# Altium PCB Prototype_REV1.PcbDoc
Units mm, origin at the board's own origin, x right, y up, seen from the top; angles counter-clockwise.
Board outline 100 x 47.5 mm, 2 copper layers (Top Layer, Bottom Layer); 146 components, 83 nets, 580 pads, 382 vias.
Unrouted connection lines stored in the file: 136.
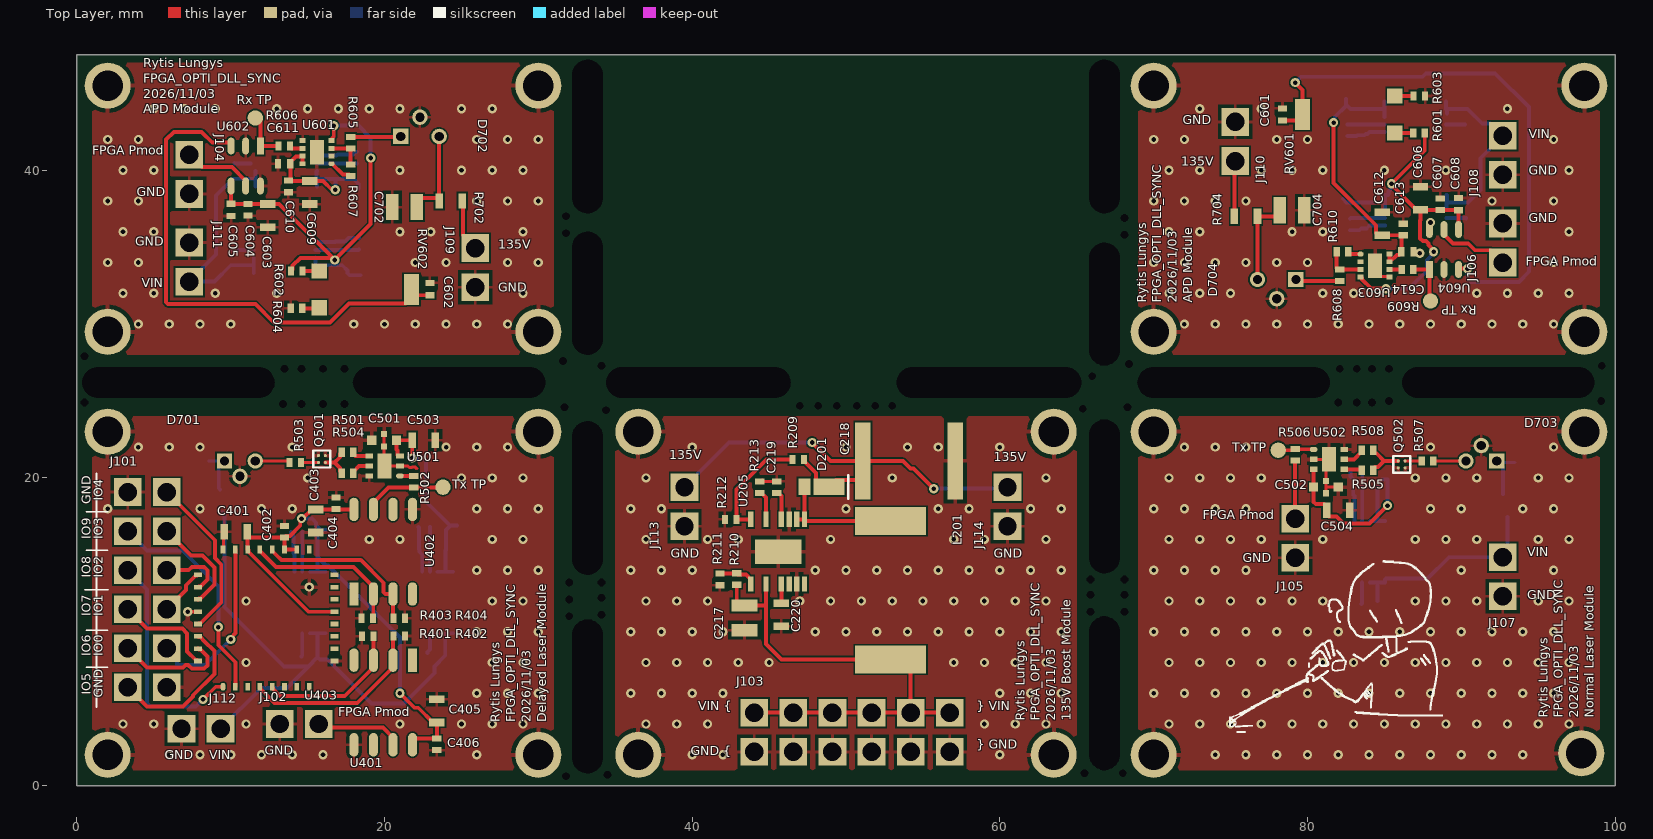
[diagram p0: Top Layer view]
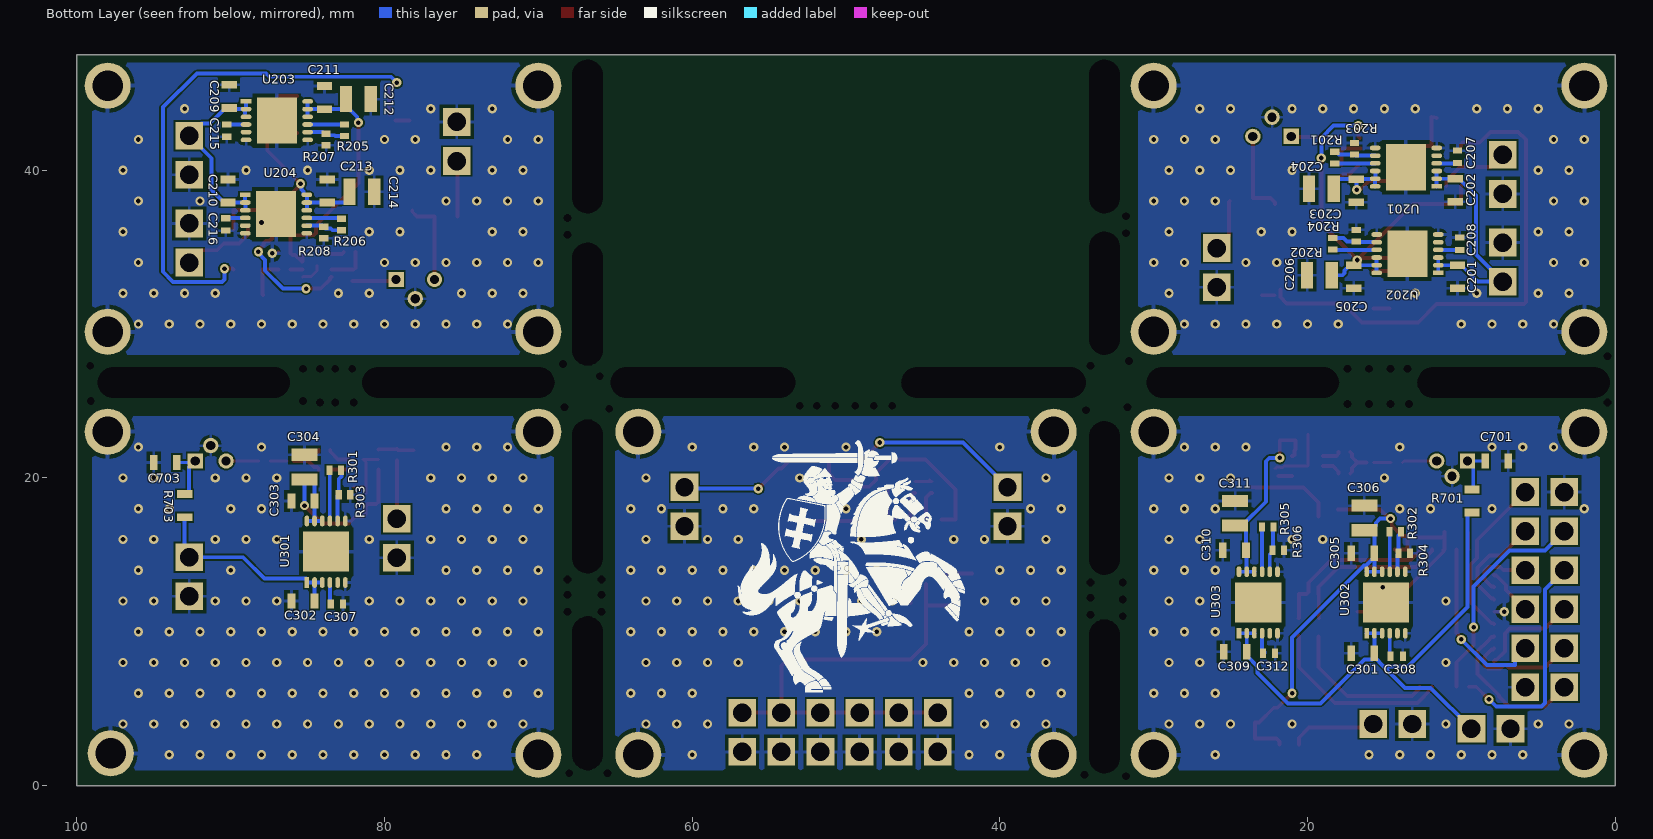
[diagram p1: Bottom Layer view, seen from below]

## Layer stack, top to bottom
Top Solder: solder mask 0.0102, Solder Resist, Dk 3.5
Top Layer: signal copper 0.0356
Dielectric 1: dielectric 0.32, FR-4, Dk 4.8
Bottom Layer: signal copper 0.0356
Bottom Solder: solder mask 0.0102, Solder Resist, Dk 3.5

## Board outline
0,0 100,0 100,47.5 0,47.5

## Design rules (kind name [scope] priority, off if disabled: settings)
BoardOutlineClearance [All] p1: gap=0.2 ignorepadtopadclearanceinfootprint=FALSE
Clearance Clearance_1 [All] p1: gap=0.1 ignorepadtopadclearanceinfootprint=FALSE
Clearance [All] p2: gap=0.203 ignorepadtopadclearanceinfootprint=FALSE except(0.25: Arc-Hole Track-Hole SMDPad-Hole THPad-Hole Via-Hole Fill-Hole Poly-Hole Region-Hole Text-Hole)
ComponentClearance [All] p1: gap=0.127 collisioncheckmode=3 verticalgap=0.127 showdistances=TRUE
DiffPairsRouting [All] p1: maxlimit=0.381 minlimit=0.203 mostfreqgap=0.203 toplayer_minwidth=0.203 toplayer_maxwidth=25.4 toplayer_prefwidth=0.203 bottomlayer_minwidth=0.203 bottomlayer_maxwidth=25.4 bottomlayer_prefwidth=0.203 maxuncoupledlength=12.7
Height [All] p1: minheight=0 maxheight=1816.048 prefheight=12.7
HoleSize [All] p1: absolutevalues=TRUE maxlimit=6.3 minlimit=0.3 maxpercent=80.000 minpercent=20.000
HoleToHoleClearance [All] p1: gap=0.25 allowstackedmicrovias=FALSE
MinimumAnnularRing [All] p1: minimumring=0.076
MinimumSolderMaskSliver [All] p1: minsoldermaskwidth=0
PlaneClearance [All] p1: clearance=0.203
PlaneConnect PlaneConnectPowerPads [InPadClass('PowerPads')] p1: planeconnectstyle=Direct reliefexpansion=0.508 reliefentries=4 reliefconductorwidth=0.254 reliefairgap=0.254
PlaneConnect [All] p2: pad.planeconnectstyle=Relief pad.reliefexpansion=0.3 pad.reliefentries=4 pad.reliefconductorwidth=0.203 pad.reliefairgap=0.203 via.planeconnectstyle=Direct via.reliefexpansion=0.3 via.reliefentries=4 via.reliefconductorwidth=0.127 via.reliefairgap=0.127
PolygonConnect PolygonConnectPowerPads [All vs (InPadClass('PowerPads'))] p1: connectstyle=Direct reliefconductorwidth=0.254 reliefentries=4 polygonreliefangle="90 Angle" airgapwidth=0.254
PolygonConnect [All] p2: thpad.connectstyle=Relief thpad.reliefconductorwidth=0.203 thpad.reliefentries=4 thpad.polygonreliefangle="90 Angle" thpad.airgapwidth=0.203 smdpad.connectstyle=Relief smdpad.reliefconductorwidth=0.203 smdpad.reliefentries=4 smdpad.polygonreliefangle="90 Angle" smdpad.airgapwidth=0.203 via.connectstyle=Direct via.reliefconductorwidth=0.127 via.reliefentries=4 via.polygonreliefangle="90 Angle" via.airgapwidth=0.127
RoutingVias [All] p1: holewidth=0.3 width=0.6 viastyle="Through Hole" minholewidth=0.3 minwidth=0.6 maxholewidth=0.6 maxwidth=6.6
SilkToSilkClearance [All] p1: silktosilkclearance=0
SilkToSolderMaskClearance [IsPad] p1: minsilkscreentomaskgap=0.127 clearancetoexposedcopper=TRUE
SolderMaskExpansion [All] p1: expansion=0.075 istentingtop=FALSE
SupplyNets "Schematic Supply Nets_6" [InNet('135V')] p1: voltage=0.000
SupplyNets "Schematic Supply Nets_5" [InNet('3V3')] p2: voltage=0.000
SupplyNets "Schematic Supply Nets_4" [InNet('Vvar')] p3: voltage=0.000
SupplyNets "Schematic Supply Nets_3" [InNet('5VGaN')] p4: voltage=0.000
SupplyNets "Schematic Supply Nets_2" [InNet('Vin')] p5: voltage=0.000
SupplyNets "Schematic Supply Nets_1" [InNet('5V')] p6: voltage=0.000
SupplyNets "Schematic Supply Nets" [InNet('GND')] p7: voltage=0.000
Width [All] p1: maxlimit=25.4 minlimit=0.203 preferedwidth=0.203 minimp=50.000000 maximp=50.000000 favimp=50.000000
20 further rules are at their usual default settings.

## Classes and differential pairs
component class Tx_PSU: C301 C302 C303 C304 C305 C306 C307 C308 C309 C310 C311 C312 R301 R302 R303 R304 R305 R306 U301 U302 U303
component class Time_Delay: C401 C402 C403 C404 C405 C406 R401 R404 R502 R504 U401 U403 U502
component class Rx_PSU: C201 C202 C203 C204 C205 C206 C207 C208 C209 C210 C211 C212 C213 C214 C215 C216 C217 C218 C219 C220 D201 L201 R201 R202 R203 R204 R205 R206 R207 R208 R209 R210 R211 R212 R213 U201 U202 U203 U204 U205
component class Light_Detection: C601 C602 C603 C604 C605 C606 C607 C608 C609 C610 C611 C612 C613 C614 R601 R602 R603 R604 R605 R606 R607 R608 R609 R610 RV601 RV602 U601 U602 U603 U604
component class Laser_System: C701 C702 C703 C704 D701 D702 D703 D704 R701 R702 R703 R704
component class Laser_Driver: C401 C402 C403 C404 Q501 Q502 R401 R502 R504 R505 R506 R507 R508 U401 U502
component class Inputs_Outputs: J101 J102 J103 J106 J108 J110 J111

## Components (designator, comment, footprint, x,y, rotation, side; value= is the part's Value field where it differs from the comment)
C201 "1uF" "1UF 0603" 10.25,33.075 r90 bottom
C202 "1uF" "1UF 0603" 10.4,38.7 r90 bottom
C203 "1uF" "1UF 0603" 16.825,38.675 r90 bottom
C204 "10uF" "10UF 0805" 19.1,38.8 r180 bottom
C205 "1uF" "1UF 0603" 17,33.075 r90 bottom
C206 "10uF" "10UF 0805" 19.225,33.175 r180 bottom
C207 "10nF" "10NF 0402" 10.25,40.875 r270 bottom
C208 "10nF" "10NF 0402" 10.1,35.225 r270 bottom
C209 "1uF" "1UF 0603" 90.1,44.8 r270 bottom
C210 "1uF" "1UF 0603" 90.175,38.65 r270 bottom
C211 "1uF" "1UF 0603" 83.9,44.725 r270 bottom
C212 "10uF" "10UF 0805" 81.7,44.625 r0 bottom
C213 "1uF" "1UF 0603" 83.725,38.65 r270 bottom
C214 "10uF" "10UF 0805" 81.475,38.6 r0 bottom
C215 "10nF" "10NF 0402" 90.25,42.575 r90 bottom
C216 "10nF" "10NF 0402" 90.325,36.475 r90 bottom
C217 "10uF" "10UF 0805" 43.4,10.9 r90 top
C218 "1uF" "1UF 2220" 57.1,21.1 r90 top
C219 "100nF" "100NF 0402" 45.5,19.4 r270 top
C220 "1uF" "1UF 0603" 45.8,11.1 r90 top
C301 "1uF" "1UF 0603" 16.4,8.6 r180 bottom
C302 "1uF" "1UF 0603" 85.3,12 r180 bottom
C303 "1uF" "1UF 0603" 85.3,18.5 r180 bottom
C304 "10uF" "10UF 0805" 85.2,20.7 r270 bottom
C305 "1uF" "1UF 0603" 16.4,15.1 r180 bottom
C306 "10uF" "10UF 0805" 16.3,17.4 r270 bottom
C307 "10nF" "10NF 0402" 83.1,11.8 r0 bottom
C308 "10nF" "10NF 0402" 14.2,8.4 r0 bottom
C309 "1uF" "1UF 0603" 24.7,8.7 r180 bottom
C310 "1uF" "1UF 0603" 24.75,15.3 r180 bottom
C311 "10uF" "10UF 0805" 24.7,17.7 r270 bottom
C312 "10nF" "10NF 0402" 22.5,8.6 r0 bottom
C401 "1uF" "1UF 0603" 10.325,16.5 r0 top
C402 "100nF" "100NF 0402" 13.5,16.5 r270 top
C403 "1uF" "1UF 0603" 15.525,17.2 r90 top
C404 "100nF" "100NF 0402" 16.85,18.35 r270 top
C405 "1uF" "1UF 0603" 23.4,4.85 r270 top
C406 "100nF" "100NF 0402" 23.4,2.675 r90 top
C501 "100n FT" "100N FT 0603" 19.175,22.45 r0 top
C502 "100n FT" "100N FT 0603" 82,19.4 r180 top
C503 "1uF" "1UF 0603" 22.55,22.45 r180 top
C504 "1uF" "1UF 0603" 82,17.9 r180 top
C601 "10nF" "10NF 0402" 78.375,43.625 r270 top
C602 "10nF" "10NF 0402" 22.95,32.275 r270 top
C603 "1uF" "1UF 0603" 12.4,37.05 r90 top
C604 "100nF" "100NF 0402" 11.125,37.425 r90 top
C605 "10nF" "10NF 0402" 10.025,37.425 r90 top
C606 "1uF" "1UF 0603" 87.35,38.175 r270 top
C607 "100nF" "100NF 0402" 88.625,37.8 r270 top
C608 "10nF" "10NF 0402" 89.825,37.8 r270 top
C609 "1uF" "1UF 0603" 15.15,38.55 r90 top
C610 "100nF" "100NF 0402" 13.75,38.95 r90 top
C611 "10nF" "10NF 0402" 13.475,40.425 r0 top
C612 "1uF" "1UF 0603" 84.85,36.525 r270 top
C613 "100nF" "100NF 0402" 86.225,36.15 r270 top
C614 "10nF" "10NF 0402" 86.5,34.7 r180 top
C701 "68pF" "2.2NF 0603" 7.7,21.1 r0 bottom
C702 "1nF" "10UF 0805" 21.3,37.6 r0 top
C703 "68pF" "2.2NF 0603" 94.252,20.998 r180 bottom
C704 "1nF" "10UF 0805" 79,37.4 r180 top
D201 "SDiode" SDIODE 48.4,19.4 r0 top
D701 "PLT5 450GB" "PLT5 450GB" 9.598,21.102 r0 top
D702 "MTAPD-06-007" MTAPD-06-007 22.3,42.2 r180 top
D703 "PLT5 450GB" "PLT5 450GB" 92.3,21.1 r180 top
D704 "MTAPD-06-007" MTAPD-06-007 78,32.9 r0 top
J101 "Spikelinis conectorius" "12PIN HEADER STRIP"#1 5.84,20.33 r180 top
J102 "Spikelinis conectorius" "2PIN HEADER STRIP" 15.725,4 r270 top
J103 "Spikelinis conectorius" "12PIN HEADER STRIP"#2 42.79,4.74 r270 top
J104 "Spikelinis conectorius" "2PIN HEADER STRIP" 7.3,41 r0 top
J105 "Spikelinis conectorius" "2PIN HEADER STRIP" 79.2,17.34 r0 top
J106 "Spikelinis conectorius" "2PIN HEADER STRIP" 92.7,34 r180 top
J107 "Spikelinis conectorius" "2PIN HEADER STRIP" 92.7,14.84 r0 top
J108 "Spikelinis conectorius" "2PIN HEADER STRIP" 92.7,42.24 r0 top
J109 "Spikelinis conectorius" "2PIN HEADER STRIP" 25.9,34.94 r0 top
J110 "Spikelinis conectorius" "2PIN HEADER STRIP" 75.3,40.6 r180 top
J111 "Spikelinis conectorius" "2PIN HEADER STRIP" 7.3,32.76 r180 top
J112 "Spikelinis conectorius" "2PIN HEADER STRIP" 9.34,3.7 r270 top
J113 "Spikelinis conectorius" "2PIN HEADER STRIP" 39.5,19.4 r0 top
J114 "Spikelinis conectorius" "2PIN HEADER STRIP" 60.5,19.4 r0 top
L201 "100uH" 100UH 52.9,8.2 r0 top
Q501 "EPC2036" EPC2036 16.15,21 r180 top
Q502 "EPC2036" EPC2036 85.9,21.1 r0 top
R201 "47K5" "47.5K 0402" 18.225,40.825 r270 bottom
R202 "23K2" "23.2K 0402" 18.35,35.225 r90 bottom
R203 "15k" "15K 0402" 16.95,41.4 r270 bottom
R204 "13K3" "13K3 0402" 16.825,35.75 r270 bottom
R205 "47K5" "47.5K 0402" 82.6,42.6 r90 bottom
R206 "23K2" "23.2K 0402" 82.8,36.475 r270 bottom
R207 "15k" "15K 0402" 83.8,42 r90 bottom
R208 "13K3" "13K3 0402" 83.95,35.95 r90 bottom
R209 "1M" "1M 0402" 46.9,21.2 r0 top
R210 "1M" "1M 0402" 42.9,13.425 r270 top
R211 "287k" "1M 0402" 41.8,13.4 r90 top
R212 "12k1" "1M 0402" 42.5,17.3 r0 top
R213 "154k" "1M 0402" 44.4,19.4 r270 top
R301 "47K5" "47.5K 0402" 83.2,20.5 r0 bottom
R302 "23K2" "23.2K 0402" 14.3,16.5 r180 bottom
R303 "15k" "15K 0402" 82.6,18.9 r0 bottom
R304 "13K3" "13K3 0402" 13.7,15.1 r0 bottom
R305 "47K5" "47.5K 0402" 22.575,16.8 r0 bottom
R306 "15k" "15K 0402" 21.9,15.3 r0 bottom
R401 "200R" "200R 0402" 18.9,9.7 r0 top
R402 "200R" "200R 0402" 20.95,9.725 r180 top
R403 "200R" "200R 0402" 18.875,10.875 r0 top
R404 "200R" "200R 0402" 20.95,10.875 r180 top
R501 "2R2" "2R2 0402" 17.6,21.675 r180 top
R502 "22R" "22R 0402" 21.9,19.75 r270 top
R503 "47R" "1R 0402" 14.2,21 r180 top
R504 "1R" "1R 0402" 17.6,20.3 r180 top
R505 "2R2" "2R2 0402" 83.9,20.5 r0 top
R506 "22R" "22R 0402" 79.2,21.5 r270 top
R507 "47R" "1R 0402" 87.8,21.1 r0 top
R508 "1R" "1R 0402" 83.9,21.8 r0 top
R601 "100R" "100R 0402" 87.25,42.425 r180 top
R602 "100R" "100R 0402" 14.3,33.45 r0 top
R603 "3K3" "3K3 0402" 87.275,44.825 r0 top
R604 "3K3" "3K3 0402" 14.275,31.025 r180 top
R605 "10R" "10R 0402" 17.8,41.8 r270 top
R606 "100R" "100R 0402" 13.475,41.575 r180 top
R607 "200R" "200R 0402" 17.8,40 r90 top
R608 "10R" "10R 0402" 82.103,33.171 r90 top
R609 "100R" "100R 0402" 86.5,33.55 r0 top
R610 "200R" "200R 0402" 82.275,34.7 r180 top
R701 "1K" "1K 0603" 9.3,18.5 r270 bottom
R702 "100k" "1K 0603" 24.3,38 r0 top
R703 "1K" "1K 0603" 93,18.2 r270 bottom
R704 "100k" "1K 0603" 76,37 r180 top
RV601 "5K TRIM" "5K TRIM" 82.675,43.625 r90 top
RV602 "5K TRIM" "5K TRIM" 18.75,32.25 r270 top
U201 "LP38798SD-ADJ/NOPB" LP38798SD-ADJ/NOPB 11.6,38.95 r0 bottom
U202 "LP38798SD-ADJ/NOPB" LP38798SD-ADJ/NOPB 11.5,33.325 r0 bottom
U203 "LP38798SD-ADJ/NOPB" LP38798SD-ADJ/NOPB 89,44.475 r180 bottom
U204 "LP38798SD-ADJ/NOPB" LP38798SD-ADJ/NOPB 89.05,38.4 r180 bottom
U205 "LT8331EMSE#PBF" LT8331EMSE#PBF 43.8,13.1 r90 top
U301 "LP38798SD-ADJ/NOPB" LP38798SD-ADJ/NOPB 85.05,13.2 r90 bottom
U302 "LP38798SD-ADJ/NOPB" LP38798SD-ADJ/NOPB 16.15,9.9 r90 bottom
U303 "LP38798SD-ADJ/NOPB" LP38798SD-ADJ/NOPB 24.45,9.9 r90 bottom
U401 "MC100EPT20DR2G" MC100EPT20DR2G 21.82,8.15 r270 top
U402 "MC100EPT21DR2G" MC100EPT21DR2G 18.01,12.45 r90 top
U403 "MC100EP195FAG" MC100EP195FAG 9.5,6.425 r90 top
U501 "LMG1025QDEERQ1" LMG1025QDEERQ1 21,20.125 r180 top
U502 "LMG1025QDEERQ1" LMG1025QDEERQ1 80.4,21.85 r0 top
U601 "OPA855IDSGT" OPA855IDSGT 16.55,40.425 r180 top
U602 "TLV3501AIDBVT" TLV3501AIDBVT 11.925,41.575 r270 top
U603 "OPA855IDSGT" OPA855IDSGT 83.45,34.55 r0 top
U604 "TLV3501AIDBVT" TLV3501AIDBVT 87.925,33.55 r90 top

## Footprints (in the part's own frame and the unit in brackets; to place one, negate y for a bottom-side part, rotate by r counter-clockwise, add the part's x,y. Pads: shape width x height; smd on the part's side, far side on the other; paste and mask are expansions set on the pad)
"1K 0603" [mm] "ERA-3AEB102V"
  rect 0.5x1 smd: 1(-0.75,0) 2(0.75,0)
  body extent -0.8,-0.4 0.8,0.4, height 0.46
"1M 0402" [mm] "RC0402FR-7D1ML"
  rect 0.4x0.6 smd: 1(-0.375,0) 2(0.375,0)
  body extent -0.5,-0.25 0.5,0.25, height 0.41
"1R 0402" [mm] "CRT0402-FZ-1R00GLF"
  rect 0.4x0.6 smd: 1(-0.371,0.003) 2(0.379,0.003)
  body extent -0.5,-0.25 0.5,0.25, height 0.36
"1UF 0603" [mm] "CGA3E1X7R1E105K080AC"
  rect 0.5x1 smd: 1(-0.75,0) 2(0.75,0)
  body extent -0.8,-0.4 0.8,0.4, height 0.81
"1UF 2220" [mm] "KTS251B105M55N0T00"
  rect 5x1 smd: 1(0,0) 2(0,6)
  body extent -2.5,0.15 2.5,5.85, height 2
"2.2NF 0603" [mm]
  rect 0.5x1 smd: 1(-0.75,0) 2(0.75,0)
  body extent -0.87,-0.48 0.87,0.48, height 0.88
"2PIN HEADER STRIP" [mm]
  rect 1.8x1.8 hole 1.2: 1(0,0) 2(0,-2.54)
  body extent -1.24,-3.94 1.3,1.26, height 9.28
"2R2 0402" [mm] "CRT0402-FZ-2R00GLF"
  rect 0.4x0.6 smd: 1(-0.371,0.003) 2(0.379,0.003)
  body extent -0.5,-0.25 0.5,0.25, height 0.36
"3K3 0402" [mm] "ERJ-U02F3301X"
  rect 0.4x0.6 smd: 1(-0.375,0) 2(0.375,0)
  body extent -0.5,-0.25 0.5,0.25, height 0.36
"5K TRIM" [mm] "3314G-1-502E"
  rect 1x1 smd: 1(-1.2,-3) 3(1.2,-3)
  rect 2x1 smd: 2(0,3)
  body extent -2.5,-3.1 2.5,3.1, height 2.74
"10NF 0402" [mm] "C0402C103J5RACTU"
  rect 0.4x0.6 smd: 1(-0.4,0) 2(0.4,0)
  body extent -0.53,-0.27 0.53,0.28, height 0.56
"10R 0402" [mm] "CRT0402-DZ-10R0GLF"
  rect 0.4x0.6 smd: 1(-0.371,0.003) 2(0.379,0.003)
  body extent -0.5,-0.25 0.5,0.25, height 0.36
"10UF 0805" [mm] "GRJ21BR61E106KE01K"
  rect 0.8x1.7 smd: 1(-0.8,0) 2(0.8,0)
  body extent -1,-0.72 1,0.72, height 1.26
"12PIN HEADER STRIP"#1 [mm] "TSW-112-07-G-S"
  rect 1.8x1.8 hole 1.2: 1(0,13.95) 2(0,11.41) 3(0,8.87) 4(0,6.33) 5(0,3.79) 7(2.54,13.95) 8(2.54,11.41) 9(2.54,8.87) 10(2.54,6.33) 11(2.54,3.79) 12(2.54,1.25) 23(0,1.25)
  body extent -1.16,0.05 3.66,15.29, height 8.39
"12PIN HEADER STRIP"#2 [mm] "TSW-112-07-G-S"
  rect 1.8x1.8 hole 1.2: 1(0,13.95) 2(0,11.41) 3(0,8.87) 4(0,6.33) 5(0,3.79) 6(0,1.25) 7(2.54,13.95) 8(2.54,11.41) 9(2.54,8.87) 10(2.54,6.33) 11(2.54,3.79) 12(2.54,1.25)
  body extent -1.16,0.05 3.66,15.29, height 8.39
"13K3 0402" [mm] "CRCW040213K3FKED"
  rect 0.4x0.6 smd: 1(-0.375,0) 2(0.375,0)
  body extent -0.5,-0.25 0.5,0.25, height 0.36
"15K 0402" [mm] "CRCW040215K0FKED"
  rect 0.4x0.6 smd: 1(-0.375,0) 2(0.375,0)
  body extent -0.5,-0.25 0.5,0.25, height 0.36
"22R 0402" [mm] "ERA-2AKD220X"
  rect 0.4x0.6 smd: 1(-0.375,0) 2(0.375,0)
  body extent -0.5,-0.25 0.5,0.25, height 0.36
"23.2K 0402" [mm] "CR0402-FX-2322GLF"
  rect 0.4x0.6 smd: 1(-0.375,0) 2(0.375,0)
  body extent -0.5,-0.25 0.5,0.25, height 0.36
"47.5K 0402" [mm] "CR0402-FX-4752GLF"
  rect 0.4x0.6 smd: 1(-0.375,0) 2(0.375,0)
  body extent -0.5,-0.25 0.5,0.25, height 0.36
"100N FT 0603" [mm] "NFM18PC104R1C3D"
  rect 0.6x0.6 smd: 1(0,0) 3(1.6,0)
  rect 0.4x0.4 smd: A2(0.8,-0.4) B2(0.8,0.4)
  body extent 0.02,-0.4 1.63,0.4, height 0.61
"100NF 0402" [mm] "C1005X7R1E104K050BB"
  rect 0.4x0.6 smd: 1(-0.375,0) 2(0.375,0)
  body extent -0.48,-0.25 0.53,0.25, height 0.51
"100R 0402" [mm] "ERA-2VEB1000X"
  rect 0.4x0.6 smd: 1(-0.375,0) 2(0.375,0)
  body extent -0.5,-0.25 0.5,0.25, height 0.37
100UH [mm] "744066101"
  rect 4.6x1.8 smd: 1(0,0) 2(0,9)
  body extent -5,-0.5 5,9.5, height 3.81
"200R 0402" [mm] "ERA-2AED201X"
  rect 0.4x0.6 smd: 1(-0.375,0) 2(0.375,0)
  body extent -0.5,-0.25 0.5,0.25, height 0.36
EPC2036 [mm]
  round 0.2 smd: 1(0,0) 2(0,-0.45) 3(0.45,0) 4(0.45,-0.45)
  silkscreen extent -0.33,-0.77 0.77,0.33, body extent -0.22,-0.67 0.67,0.22, height 0.93
LMG1025QDEERQ1 [mm]
  oval 0.5x0.35 smd: 1(0,0)
  rect 0.5x0.35 smd: 2(0,-0.65) 3(0,-1.3) 4(2,-1.3) 5(2,-0.65) 6(2,0)
  rect 0.9x1.6 smd: 7(1,-0.65)
  body extent 0,-1.65 2,0.35, height 0.79
LP38798SD-ADJ/NOPB [mm]
  rect 0.7x0.3 smd: 1(0,0)
  oval 0.7x0.3 smd: 2(0,-0.5) 3(0,-1) 4(0,-1.5) 5(0,-2) 6(0,-2.5) 7(4,-2.5) 8(4,-2) 9(4,-1.5) 10(4,-1) 11(4,-0.5) 12(4,0)
  rect 2.6x3 smd: 13(2,-1.25)
  body extent 0,-3.25 4,0.75, height 0.99
LT8331EMSE#PBF [mm]
  rect 1x0.35 smd: 1(0,0) 2(0,-1) 3(0,-2) 4(0,-2.5) 5(0,-3) 6(0,-3.5) 7(4.2,0) 8(4.2,-1) 9(4.2,-2) 10(4.2,-2.5) 11(4.2,-3) 12(4.2,-3.5)
  rect 1.6x3 smd: 13(2.1,-1.8)
  body extent -0.36,-3.77 4.56,0.27, height 0.89
MC100EP195FAG [mm]
  oval 0.5x0.3 smd: 1(0,0)
  rect 0.5x0.3 smd: 2(0,-0.8) 3(0,-1.6) 4(0,-2.4) 5(0,-3.2) 6(0,-4) 7(0,-4.8) 8(0,-5.6) 17(8.925,-5.6) 18(8.925,-4.8) 19(8.925,-4) 20(8.925,-3.2) 21(8.925,-2.4) 22(8.925,-1.6) 23(8.925,-0.8) 24(8.925,0)
  rect 0.3x0.5 smd: 9(1.675,-7.25) 10(2.475,-7.25) 11(3.275,-7.25) 12(4.075,-7.25) 13(4.875,-7.25) 14(5.675,-7.25) 15(6.475,-7.25) 16(7.275,-7.25) 25(7.275,1.625) 26(6.475,1.625) 27(5.675,1.625) 28(4.875,1.625) 29(4.075,1.625) 30(3.275,1.625) 31(2.475,1.625) 32(1.675,1.625)
  body extent -0.03,-7.3 8.98,1.7, height 1.61
MC100EPT20DR2G [mm]
  rect 1.52x0.6 smd: 1(0,0)
  oval 1.52x0.6 smd: 2(0,-1.27) 3(0,-2.54) 4(0,-3.81) 5(5.5,-3.81) 6(5.5,-2.54) 7(5.5,-1.27) 8(5.5,0)
  body extent -0.22,-4.38 5.77,0.53, height 1.76
MC100EPT21DR2G [mm]
  rect 1.52x0.6 smd: 1(0,0)
  oval 1.52x0.6 smd: 2(0,-1.27) 3(0,-2.54) 4(0,-3.81) 5(5.5,-3.81) 6(5.5,-2.54) 7(5.5,-1.27) 8(5.5,0)
  body extent -0.22,-4.38 5.77,0.53, height 1.76
MTAPD-06-007 [mm]
  rect 1x1 / inner rect 1.8x1.8 / far side rect 1x1 hole 0.6: 1(1.25,0)
  round 1 / inner rect 1.8x1.8 / far side round 1 hole 0.6: 2(-1.25,0) 3(0,-1.25)
  body extent -3.54,-2.67 2.67,2.67, height 3.76
OPA855IDSGT [mm]
  oval 0.4x0.32 smd: 1(0,0)
  rect 0.4x0.32 smd: 2(0,-0.5) 3(0,-1) 4(0,-1.5) 5(1.875,-1.5) 6(1.875,-1) 7(1.875,-0.5) 8(1.875,0)
  rect 0.9x1.6 smd: 9(0.95,-0.75)
  body extent -0.05,-1.75 1.95,0.25, height 0.79
"PLT5 450GB" [mm]
  rect 1x1 / inner rect 1.8x1.8 / far side rect 1x1 hole 0.6: 1(0,0)
  round 1 / inner rect 1.8x1.8 / far side round 1 hole 0.6: 2(1,-1) 3(2,0)
  body extent -1.78,-2.73 3.75,2.78, height 3.51
SDIODE [mm] "RB558VAM150TR"
  rect 2x1.1 smd: 1(0.5,0.025)
  rect 0.8x1.1 smd: 2(-1.1,0.025)
  silkscreen extent 1.75,-0.75 1.75,0.77, body extent -1.25,-0.7 1.25,0.7, height 0.61
TLV3501AIDBVT [mm]
  rect 1.1x0.45 smd: 1(0,0)
  oval 1.1x0.45 smd: 2(0,-0.95) 3(0,-1.9) 4(2.6,-1.9) 5(2.6,-0.95) 6(2.6,0)
  body extent 0,-2.4 2.8,0.5, height 1.11

## Part data
C201 C202 C203 C205 C209 C210 C211 C213 C220 C301 C302 C303 C305 C309 C310 C401 C403 C405 C503 C504 C603 C606 C609 C612: library part "1uF 0603", "CGA3E1X7R1E105K080AC"
C204 C206 C212 C214 C217 C304 C306 C311: library part "10uF 0805", "GRJ21BR61E106KE01K"
C207 C208 C215 C216 C307 C308 C312 C601 C602 C605 C608 C611 C614: library part "10nF 0402", "C0402C103J5RACTU"
C218: library part "1uF 2220"
C219 C402 C404 C406 C604 C607 C610 C613: library part "100n 0402", "C1005X7R1E104K050BB"
C501 C502: library part "100n 0603 FT", "NFM18PC104R1C3D"
C701: library part "2.2nF 0603", "C0603X222K1REC7411"
C702 C704: library part "1nF 0805", "GCM21AR72E102KWB1J"
C703: library part "2.2nF 0603", "C0402C680K5RACAUTO"
D201: library part 755-RB558VAM150TR
D701 D703: "Lazeris"
J101 J103: library part 12PinConnector, "TSW-112-07-G-S"
J102 J104 J105 J106 J107 J108 J109 J110 J111 J112 J113 J114: library part 2PinConnector
L201: "744066101"
R201 R205 R301 R305: library part "47K5 0402", "CR0402-FX-4752GLF"
R202 R206 R302: library part "23K2 0402", "CR0402-FX-2322GLF"
R203 R207 R303 R306: library part "15k 0402", "CRCW040215K0FKED"
R204 R208 R304: library part "13K3 0402", "CRCW040213K3FKED"
R209 R210: library part "1M 0402", "RC0402FR-7D1ML"
R211: library part "287k 0402", "RC0402FR-07287KL"
R212: library part "12k1 0402", "RC0402FR-0712K1L"
R213: library part "154k 0402", "RE0402BRE07154KL"
R401 R402 R403 R404 R607 R610: library part "200R 0402", "ERA-2AED201X"
R501 R505: library part "2R2 0402", "CRT0402-FZ-2R00GLF"
R502 R506: library part "22R 0402", "ERA-2AKD220X"
R503 R507: library part "47R 0402", "CRCW040247R0FKED"
R504 R508: library part "1R 0402", "CRT0402-FZ-1R00GLF"
R601 R602 R606 R609: library part "100R 0402", "ERA-2VEB1000X"
R603 R604: library part "3K3 0402", "ERJ-U02F3301X"
R605 R608: library part "10R 0402", "CRT0402-DZ-10R0GLF"
R701 R703: library part "1K 0603", "ERA-3AEB102V"
R702 R704: library part "100k 0603", "CR0603-FX-1003ELF"
RV601 RV602: "3314G-1-502E"
U201 U202 U203 U204 U301 U302 U303: "input 3-20V output 1.5-5V"
U501 U502: "GaN Driver"
U601 U603: "OP ampas"
U602 U604: "Comparatorius"

## Free pads (board coordinates)
  round 3 hole 2: 2(2,2) 2(2,23) 2(2,29.5) 2(2,45.5) 2(30,2) 2(30,23) 2(30,29.5) 2(30,45.5) 2(36.5,2) 2(36.5,23) 2(63.5,2) 2(63.5,23) 2(70,2) 2(70,23) 2(70,29.5) 2(70,45.5) 2(97.8,2.1) 2(98,23) 2(98,29.5) 2(98,45.5)
  rect 0x0 hole 0.5 unplated: 4(0.5,24.9) 4(0.5,27.9) 4(13.4,24.8) 4(13.5,27.1) 4(14.6,24.8) 4(14.6,27.1) 4(16,24.8) 4(16,27.1) 4(17.4,24.8) 4(17.4,27.1) 4(31.6,27.6) 4(31.7,24.6) 4(31.8,0.6) 4(31.8,35.9) 4(31.8,37) 4(32,11) 4(32,12.1) 4(32,13.2) 4(34.1,11.1) 4(34.1,12.2) 4(34.1,13.2) 4(34.1,27.3) 4(34.4,24.4) 4(34.5,0.7) 4(47,24.7) 4(48.2,24.7) 4(49.4,24.7) 4(50.7,24.7) 4(51.9,24.7) 4(53,24.7) 4(65.4,24.5) 4(65.5,0.8) 4(65.9,11.3) 4(65.9,12.4) 4(65.9,13.4) 4(66,26.6) 4(68,0.8) 4(68.1,11.3) 4(68.1,12.4) 4(68.1,13.4) 4(68.1,35.8) 4(68.1,36.9) 4(68.3,24.6) 4(68.4,27.4) 4(82,24.9) 4(82.1,27.1) 4(83.2,24.9) 4(83.2,27.1) 4(84.2,24.9) 4(84.2,27.1) 4(85.3,25) 4(85.3,27.1) 4(99.1,25) 4(99.133,27.292)
  rect 0x0 hole 2 slot 12.5 at 0 deg unplated: 4(6.6,26.2) 4(24.2,26.2) 4(75.2,26.2) 4(92.4,26.2)
  rect 0x0 hole 2 slot 10 at 90 deg unplated: 4(33.2,5.8) 4(33.2,18.7) 4(33.2,42.2) 4(66.8,6) 4(66.8,18.8) 4(66.8,42.2)
  rect 0x0 hole 2 slot 8 at 90 deg unplated: 4(33.2,32) 4(66.8,31.3)
  rect 0x0 hole 2 slot 12 at 0 deg unplated: 4(40.4,26.2) 4(59.3,26.2)
  round 1 smd: 5(23.8,19.4) 6(11.6,43.4) 7(78.1,21.8) 8(88,31.5)

## Via types
v1: diameter 0.6, hole 0.3, Top Layer to Bottom Layer, tented both sides, 380 vias
v2: diameter 0.6, hole 0.3, Top Layer to Bottom Layer, 2 vias

## Nets (pads, with @x,y where several pads share a name; then routed paths per layer and width w, separated by ;. In a path a pad name is that pad's centre, name@x,y a point inside that pad or via, vN(x,y) a via of type N, cw(c..) or ccw(c..) an arc to the next point about the centre after c; other vN are vias at no path point)
3V3: C205.2 C206.2 C213.2 C214.2 C305.2 C306.2 C401.2 C402.2 C403.2 C404.2 C405.2 C406.2 C603.2 C604.2 C605.2 C606.2 C607.2 C608.2 R601.1 R602.1 U202.10 U202.11 U202.12 U204.10 U204.11 U204.12 U302.10 U302.11 U302.12 U401.8 U402.8 U403.13 U403.18 U403.19 U403.22 U601.4 U602.4 U603.4 U604.4 | length 97.3
  Top Layer w0.254: U602.4 C605.2 10.038,37.813 11.112,37.813 C604.2 13.127,37.8 v1@16.706,34.221 ; R602.1 14.025,33.55 14.025,33.801 14.528,34.304 16.514,34.304 16.651,34.167 v1(16.76,34.167) 19.1,36.507 v1(19.1,40.8) ; U403.18 U403.19 C402.2 ; 16.6,42.1 16.7,42.2 v1(16.7,42.9) ; U403.13 15.049,11.3 11.15,15.199 11.15,15.3 U403.22 11.087,15.362 11.087,16.488 C401.2 11.075,16.275 11.225,16.125 C402.2 ; U402.8 C403.2 15.275,17.95 14.679,17.354 v1(14.6,17.354) 14.523,17.277 14.523,16.898 13.851,16.225 13.6,16.225 C402.2 ; v1(21,6) 21.94,5.06 22.19,5.06 23.15,4.1 C405.2 C406.2 22.005,3.05 21.82,2.865 U401.8 ; U603.4 83.49,33.05 83.55,32.99 83.55,32.899 84.149,32.3 v1(85.1,32.3) ; R601.1 87.625,41.285 v1(85.465,39.125) 85.465,39.06 87.1,37.425 C606.2 ; v1(88.2,34.7) 88.2,34.794 87.865,35.129 87.865,35.246 87.716,35.395 87.498,35.395 87.319,35.574 87.319,36.726 87.346,36.753 87.346,37.421 C606.2 ; U604.4 C608.2 89.813,37.413 88.638,37.413 C607.2 C606.2
  Bottom Layer w0.254: v1(14.6,17.354) 15.279,17.354 15.55,17.083 15.55,16.9 15.85,16.6 C306.2 15.95,16.6 15.65,16.3 C305.2 ; U302.10 U302.11 ; U202.12 U202.11 ; U202.10 U202.11 ; U302.12 U302.11 ; v1(16.7,42.9) 18.3,42.9 19.1,42.1 v1(19.1,40.8) ; v1(16.76,34.167) 16.76,33.975 16.91,33.825 C205.2 ; C206.2 17.725,33.175 17.584,33.316 17.584,33.491 17.25,33.825 C205.2 ; v1(21,6) 21,9.616 16.316,14.3 16.2,14.3 15.65,14.85 C305.2 ; C214.2@82.3,38.15 82.55,37.9 C213.2 U204.11 ; U204.10 U204.11 ; v1(85.1,32.3) 86.6,32.3 87.767,33.467 87.767,34.173 88.2,34.606 v1(88.2,34.7) ; v1(85.465,39.125) 85.388,39.049 85.388,38.738 85.269,38.619 85.269,38.446 85.223,38.4 U204.12 U204.11 ; U202.11 C205.2 ; U302.11 C305.2
5V: C203.2 C204.2 C211.2 C212.2 C609.2 C610.2 C611.2 C612.2 C613.2 C614.2 U201.10 U201.11 U201.12 U203.10 U203.11 U203.12 U601.7 U601.8 U603.7 U603.8 | length 29.6
  Top Layer w0.254: U601.8 U601.7 14.635,40.885 14.235,40.885 13.875,40.525 C611.2 13.875,39.425 13.775,39.325 C610.2 13.762,39.313 15.138,39.313 C609.2 16,39.3 16.6,38.7 16.771,38.7 v1(16.8,38.729) ; v1(81.7,43.1) 81.7,39.174 84.45,36.424 84.45,35.925 84.6,35.775 C612.2 C613.2 86.2,35.775 86.1,35.675 C614.2 86.1,34.6 86,34.5 85.815,34.5 U603.7@85.365,34.05 ; U603.7 U603.8
  Bottom Layer w0.254: U201.12 15.6,39.425 15.612,39.438 16.813,39.438 C203.2 ; U201.11 15.575,39.475 15.575,39.925 U201.10 ; v1(16.8,38.729) 16.8,39.4 C203.2 ; C204.2 18.3,39.125 18,39.425 C203.2 ; v1(81.7,43.1) 81.777,43.177 81.777,43.452 82.5,44.175 C212.2 82.5,44.275 82.8,43.975 C211.2 U203.11 ; U203.10 U203.11 ; U203.12 U203.11
5VGaN: C303.2 C304.2 C310.2 C311.2 C501.3 C502.3 C503.2 C504.2 U301.10 U301.11 U301.12 U303.10 U303.11 U303.12 U501.3 U502.3 | length 28.4
  Top Layer w0.254: U501.3 20.925,21.425 20.85,21.5 20.85,21.775 20.775,21.85 C501.3 C503.2 v1(21.8,21.3) v1@21.737,21.363 ; U502.3 C502.3 80.4,18.441 80.541,18.3 81.1,18.3 81.25,18.15 C504.2 81.25,17.65 81.4,17.5 81.899,17.5 82.353,17.046 84.046,17.046 v1(85.2,18.2)
  Bottom Layer w0.254: v1(21.8,21.3) 22.483,21.3 22.7,21.083 22.7,18.45 24.25,16.9 C311.2 24.3,16.9 24,16.6 C310.2 23.969,15.269 23.969,13.919 U303.11 ; U303.10 U303.11 ; U303.12 U303.11 ; U301.10 U301.11 ; U301.12 U301.11 ; v1(85.2,18.2) C304.2 84.85,19.9 84.55,19.6 C303.2 U301.11
135V: C218.2 D201.1 J109.1 J110.1 J113.1 J114.1 R209.2 R702.2 R704.2 | length 36.6
  Top Layer w0.254: R702.2 25.1,37.95 25.1,35.74 J109.1 ; R209.2 47.275,21.1 48.054,20.321 48.054,19.875 48.504,19.425 D201.1 49.35,19.875 50.7,19.875 51.1,20.275 C218.2 ; v1(47.8,22.3) 49,21.1 C218.2 ; v1(55.7,19.3) 54.4,20.6 54.2,20.6 53.7,21.1 C218.2 ; R704.2 75.25,40.55 J110.1
  Bottom Layer w0.254: J113.1 42.4,22.3 v1(47.8,22.3) ; v1(55.7,19.3) 60.4,19.3 J114.1
DelayLaserAnode: C701.2 D701.1 R701.1 | length 3.1
  Bottom Layer w0.203: C701.2@8.547,21.102 D701.1
  Bottom Layer w0.254: R701.1 9.223,19.327 9.223,20.726 D701.1
EtalonLaserAnode: C703.2 D703.1 R703.1 | length 3.6
  Bottom Layer w0.203: D703.1 92.402,20.998 C703.2
  Bottom Layer w0.254: D703.1 92.7,20.7 R703.1@92.7,18.95
GND: C201.1 C202.1 C203.1 C204.1 C205.1 C206.1 C207.1 C208.1 C209.1 C210.1 C211.1 C212.1 C213.1 C214.1 C215.1 C216.1 C217.1 C218.1 C219.1 C220.1 C301.1 C302.1 C303.1 C304.1 C305.1 C306.1 C307.1 C308.1 C309.1 C310.1 C311.1 C312.1 C401.1 C402.1 C403.1 C404.1 C405.1 C406.1 C501.1 C501.A2 C501.B2 C502.1 C502.A2 C502.B2 C503.1 C504.1 C601.1 C602.1 C603.1 C604.1 C605.1 C606.1 C607.1 C608.1 C609.1 C610.1 C611.1 C612.1 C613.1 C614.1 C701.1 C702.1 C703.1 C704.1 D701.2 D702.3 D703.2 D704.3 J101.1 J101.12 J102.2 J103.7 J103.8 J103.9 J103.10 J103.11 J103.12 J104.2 J105.2 J106.2 J107.2 J108.2 J109.2 J110.2 J111.2 J112.2 J113.2 J114.2 pad.2 Q501.2 Q501.4 Q502.2 Q502.4 R203.1 R204.1 R207.1 R208.1 R211.1 R212.1 R213.1 R303.1 R304.1 R306.1 R401.1 R402.1 R403.1 R404.1 R603.2 R604.2 U201.6 U201.7 U201.13 U202.6 U202.7 U202.13 U203.6 U203.7 U203.13 U204.6 U204.7 U204.13 U205.5 U205.10 U205.13 U301.6 U301.7 U301.13 U302.6 U302.7 U302.13 U303.6 U303.7 U303.13 U401.5 U402.5 U403.9 U403.24 U403.28 U501.2 U501.6 U501.7 U502.2 U502.6 U502.7 U601.5 U601.9 U602.2 U602.6 U603.5 U603.9 U604.2 U604.6 | length 13.9
  Top Layer w0.203: v2(7.2,11.3) U403.28 ; U403.24 9.537,15.388 9.537,16.462 C401.1 ; C501.B2 C501.A2 19.975,20.8 U501.7 U501.2 21.525,20.775 21.616,20.684 21.784,20.684 21.8,20.7 22,20.7 22.1,20.6 ; R213.1@44.58,19.873 44.481,19.775 R213.1 C219.1 ; U502.2 U502.7 81.2,21 C502.A2 81.2,19.4 ; C502.B2 81.2,19.4 ; C502.1 81.2,19.4 ; U603.9 84.4,33.45 84.748,33.102 85.273,33.102 U603.5 ; C614.1 86.95,34.65 87.25,34.65 v2(87.3,34.6) ; U604.6@87.912,36.163 88,36.25 v1(88,36.6)
  other v1: 6,2 8,2 10,2 12,2 14,2 16,2 26,2 40,2 42,2 60,2 74,2 76,2 78,2 80,2 82,2 84,2 86,2 88,2 90,2 92,2 94,2 3,4 5,4 11,4 21,4 25,4 27,4 29,4 37,4 39,4 41,4 59,4 61,4 63,4 71,4 73,4 75,4 77,4 79,4 81,4 83,4 85,4 87,4 89,4 91,4 93,4 95,4 97,4 26,6 28,6 30,6 36,6 38,6 40,6 42,6 60,6 62,6 64,6 70,6 72,6 74,6 76,6 78,6 80,6 82,6 84,6 86,6 88,6 90,6 92,6 94,6 96,6 11,8 27,8 29,8 37,8 39,8 41,8 43,8 45,8 57,8 59,8 61,8 63,8 71,8 73,8 75,8 77,8 79,8 81,8 83,8 85,8 87,8 89,8 91,8 93,8 95,8 97,8 26,10 28,10 30,10 36,10 38,10 40,10 42,10 48,10 50,10 52,10 54,10 56,10 58,10 60,10 62,10 64,10 70,10 72,10 74,10 76,10 78,10 80,10 82,10 84,10 86,10 88,10 90,10 92,10 94,10 96,10 11,12 27,12 29,12 37,12 39,12 41,12 47,12 49,12 51,12 53,12 55,12 57,12 59,12 61,12 63,12 71,12 73,12 75,12 77,12 79,12 81,12 87,12 89,12 91,12 95,12 97,12 15.1,12.9 26,14 28,14 30,14 36,14 38,14 40,14 48,14 50,14 52,14 54,14 56,14 58,14 60,14 62,14 64,14 70,14 72,14 74,14 76,14 90,14 96,14 19,16 21,16 27,16 29,16 37,16 41,16 43,16 49,16 57,16 59,16 63,16 71,16 73,16 75,16 77,16 81,16 87,16 89,16 91,16 95,16 97,16 2,18 8,18 12,18 14,18 26,18 28,18 30,18 36,18 38,18 50,18 56,18 58,18 62,18 64,18 70,18 72,18 74,18 76,18 88,18 90,18 94,18 96,18 15,20 25,20 27,20 29,20 37,20 53,20 63,20 71,20 73,20 75,20 77,20 87,20 89,20 91,20 95,20 97,20 4,22 6,22 8,22 14,22 24,22 26,22 28,22 40,22 50,22 54,22 56,22 60,22 72,22 74,22 76,22 88,22 96,22 4,30 6,30 8,30 10,30 18,30 20,30 22,30 24,30 26,30 28,30 72,30 74,30 76,30 78,30 80,30 82,30 84,30 86,30 88,30 90,30 92,30 94,30 96,30 3,32 5,32 9,32 13,32 29,32 71,32 73,32 75,32 81,32 83,32 91,32 93,32 95,32 97,32 2,34 4,34 22,34 24,34 28,34 30,34 70,34 72,34 74,34 76,34 78,34 80,34 96,34 3,36 5,36 21,36 23,36 29,36 71,36 73,36 79,36 81,36 97,36 2,38 4,38 26,38 28,38 30,38 70,38 72,38 74,38 76,38 92,38 96,38 3,40 5,40 21,40 25,40 27,40 29,40 71,40 73,40 77,40 79,40 81,40 85,40 89,40 97,40 2,42 4,42 26,42 28,42 30,42 70,42 72,42 78,42 80,42 96,42 5,44 7,44 9,44 13,44 15,44 17,44 19,44 21,44 25,44 27,44 73,44 77,44 93,44
NetC207_2: C207.2 U201.4 | length 1
  Bottom Layer w0.254: C207.2 10.275,40.45 11.196,40.45 11.2,40.446 U201.4@11.275,40.446
NetC208_2: C208.2 U202.4 | length 1.4
  Bottom Layer w0.254: C208.2 U202.4
NetC215_2: C215.2 U203.4 | length 1.2
  Bottom Layer w0.254: U203.4 C215.2
NetC216_2: C216.2 U204.4 | length 1.3
  Bottom Layer w0.254: U204.4 90.3,36.9 C216.2
NetC219_2: C219.2 U205.9 | length 1.9
  Top Layer w0.254: C219.2 45.6,19.025 45.8,18.825 U205.9
NetC220_2: C220.2 U205.3 | length 1.2
  Top Layer w0.254: C220.2 U205.3
NetC307_2: C307.2 U301.4 | length 1.4
  Bottom Layer w0.254: C307.2 83.55,11.85 U301.4
NetC308_2: C308.2 U302.4 | length 1.5
  Bottom Layer w0.254: C308.2 14.65,8.45 U302.4
NetC312_2: C312.2 U303.4 | length 1.4
  Bottom Layer w0.254: C312.2@22.8,8.6 22.8,8.7 22.95,8.85 U303.4
NetC702_2: C702.2 D702.2 R702.1 | length 5.7
  Top Layer w0.254: C702.2@22.1,37.8 22.1,37.9 22.4,38.2 23.55,38.2 D702.2
NetC704_2: C704.2 D704.2 R704.1 | length 5.8
  Top Layer w0.254: D704.2 R704.1 77.9,37 78.2,37.3 C704.2
NetD201_2: D201.2 L201.2 U205.11 U205.12 | length 8.3
  Top Layer w0.254: U205.11 U205.12 ; D201.2 U205.12 ; L201.2 47.375,17.2 47.3,17.275 U205.12
NetD701_3: D701.3 R503.2 | length 2.3
  Top Layer w0.203: D701.3 13.722,21.102 13.821,21.003 R503.2
NetD702_1: D702.1 R605.1 | length 3
  Top Layer w0.254: R605.1 20.729,42.171 D702.1@20.75,42.15
NetD703_3: D703.3 R507.2 | length 2.2
  Top Layer w0.203: R507.2 88.181,21.101 90.199,21.101 90.2,21.1 D703.3@90.4,21.1
NetD704_1: D704.1 R608.1 | length 2.9
  Top Layer w0.254: D704.1@79.25,32.85 79.3,32.8 R608.1
NetJ101_2: J101.2 U403.23 | length 11.5
  Top Layer w0.254: v1(10,9.5) 10,9.608 10.3,9.908 U403.23
  Bottom Layer w0.254: J101.2 6.5,8.26 6.5,7.834 8.334,7.834 v1(10,9.5)
NetJ101_3: J101.3 U403.25 | length 3.1
  Top Layer w0.254: J101.3 7.094,12.714 7.094,13.02 7.724,13.65 7.825,13.65 U403.25
NetJ101_4: J101.4 U403.26 | length 4.2
  Top Layer w0.254: J101.4 7.274,14 7.478,14.204 8.272,14.204 8.479,13.997 8.479,13.403 8.026,12.95 7.925,12.95 U403.26
NetJ101_5: J101.5 U403.27 | length 6.7
  Top Layer w0.254: J101.5 7.418,14.962 8.155,14.962 8.933,14.185 8.933,13.057 8.026,12.15 7.925,12.15 U403.27
NetJ101_6: J101.23 U403.29 | length 10.7
  Top Layer w0.254: J101.23 8.971,15.949 8.971,14.789 9.387,14.373 9.387,11.911 8.026,10.55 7.925,10.55 U403.29
NetJ101_7: J101.7 U403.30 | length 10
  Top Layer w0.254: J101.7 4.554,5.126 6.887,5.126 7.546,5.785 7.546,5.871 8.933,7.258 8.933,8.743 8.272,9.404 8.025,9.65 7.925,9.65 U403.30
NetJ101_8: J101.8 U403.31 | length 7.4
  Top Layer w0.254: J101.8 4.554,7.666 6.887,7.666 7.065,7.844 7.23,7.844 7.478,7.596 8.272,7.596 8.479,7.803 8.479,8.397 8.272,8.604 8.025,8.85 7.925,8.85 U403.31
NetJ101_9: J101.9 U403.32 | length 6.7
  Top Layer w0.254: J101.9 4.554,10.206 6.855,10.206 7.167,9.894 7.167,8.708 7.724,8.15 7.825,8.15 U403.32
NetJ101_10: J101.10 U403.1 | length 14.7
  Top Layer w0.254: v1(8.2,5.6) 9.025,6.425 U403.1
  Bottom Layer w0.254: J101.10 4.554,12.746 4.554,5.365 4.793,5.126 7.726,5.126 v1(8.2,5.6)
NetJ101_11: J101.11 U403.2 | length 14.4
  Top Layer w0.254: v1(9.2,10.3) 9.2,9.118 10.3,8.018 U403.2
  Bottom Layer w0.254: J101.11 4.554,15.286 6.855,15.286 9.2,12.941 v1(9.2,10.3)
NetJ102_1: J102.1 U401.7 | length 5.7
  Top Layer w0.254: J102.1@15.725,3.5 15.989,3.764 19.896,3.764 20.55,3.11 U401.7
NetJ104_1: J104.1 U602.5 | length 4.7
  Top Layer w0.254: J104.1 8.1,40.2 10.075,40.2 10.975,39.3 U602.5
NetJ105_1: J105.1 R506.2 | length 3.8
  Top Layer w0.254: J105.1 R506.2
NetJ106_1: J106.1 U604.5 | length 4.9
  Top Layer w0.254: U604.5 88.875,35.825 89.454,35.246 90.454,35.246 90.9,34.8 91.9,34.8 J106.1
NetQ501_1: Q501.1 R501.2 R504.2 | length 2.4
  Top Layer w0.254: Q501.1 16.756,21 ; R504.2 17.096,20.422 17.096,20.653 16.753,20.996 17.096,21.34 17.096,21.547 R501.2
NetQ501_3: Q501.3 R503.1 | length 1.1
  Top Layer w0.203: R503.1 15.697,20.997 Q501.3
NetQ502_1: Q502.1 R505.2 R508.2 | length 3
  Top Layer w0.254: R505.2 84.279,20.603 84.379,20.703 84.585,20.703 84.968,21.086 ; R508.2 84.279,21.703 84.379,21.603 84.479,21.603 84.982,21.1 Q502.1
NetQ502_3: Q502.3 R507.1 | length 1.1
  Top Layer w0.203: Q502.3 87.426,21.1 R507.1
NetR201_1: R201.1 R203.2 U201.8 | length 2.7
  Bottom Layer w0.254: U201.8 16.875,40.95 R203.2 17.95,41.025 18.125,41.2 R201.1
NetR201_2: R201.2 U201.9 | length 2.6
  Bottom Layer w0.254: U201.9 16.474,40.45 R201.2
NetR202_1: R202.1 U202.9 | length 2.9
  Bottom Layer w0.254: U202.9 16.374,34.825 16.378,34.821 18.321,34.821 R202.1
NetR202_2: R202.2 R204.2 U202.8 | length 3
  Bottom Layer w0.254: U202.8 16.775,35.325 R204.2 17.425,35.375 17.65,35.6 R202.2
NetR205_1: R205.1 R207.2 U203.8 | length 2.5
  Bottom Layer w0.254: R205.1 83.2,42.225 83.25,42.275 83.7,42.275 R207.2 ; R207.2@83.8,42.35 83.9,42.35 84.025,42.475 U203.8
NetR205_2: R205.2 U203.9 | length 2.4
  Bottom Layer w0.254: R205.2 U203.9
NetR206_1: R206.1 U204.9 | length 2.3
  Bottom Layer w0.254: R206.1@82.775,36.85 82.825,36.9 U204.9
NetR206_2: R206.2 R208.2 U204.8 | length 2.4
  Bottom Layer w0.254: R206.2@82.775,36.1 83.375,36.1 83.5,36.225 83.85,36.225 R208.2 84.025,36.4 U204.8
NetR209_1: R209.1 R212.2 U205.7 | length 7.3
  Top Layer w0.254: U205.7 R212.2 42.875,19.251 44.824,21.2 R209.1
NetR210_1: R210.1 R211.2 U205.1 | length 2.5
  Top Layer w0.254: R211.2 41.813,13.788 42.888,13.788 R210.1 42.975,13.725 43.5,13.725 43.8,13.425 U205.1
NetR213_2: R213.2 U205.8 | length 1.9
  Top Layer w0.254: R213.2 44.5,19.025 44.8,18.725 U205.8
NetR301_1: R301.1 R303.2 U301.8 | length 3.4
  Bottom Layer w0.254: R301.1 82.8,20.475 82.8,20.1 82.975,19.925 R303.2 83.05,18.825 U301.8
NetR301_2: R301.2 U301.9 | length 3.3
  Bottom Layer w0.254: U301.9 83.562,17.212 83.562,20.488 R301.2
NetR302_1: R302.1 U302.9 | length 2.6
  Bottom Layer w0.254: U302.9 14.65,16.475 R302.1
NetR302_2: R302.2 R304.2 U302.8 | length 2.7
  Bottom Layer w0.254: R302.2 13.925,16.4 14.075,16.25 R304.2 14.15,15.025 U302.8
NetR305_1: R305.1 R306.2 U303.8 | length 2.9
  Bottom Layer w0.254: R305.1 22.238,16.762 22.238,15.338 R306.2 ; R306.2@22.275,15.2 22.45,15.025 U303.8
NetR305_2: R305.2 U303.9 | length 2.9
  Bottom Layer w0.254: U303.9 R305.2
NetR401_2: R401.2 U401.3 U403.5 | length 9.7
  Top Layer w0.254: U403.5 12.75,6.375 12.75,6.274 13.203,5.821 17.411,5.821 19.28,7.69 U401.3 19.278,8.152 19.278,9.698 R401.2
NetR402_2: R402.2 U401.2 U403.4 | length 12.2
  Top Layer w0.254: U403.4 11.95,6.375 11.95,6.274 12.857,5.367 18.227,5.367 20.55,7.69 U401.2 20.562,8.162 20.562,9.713 R402.2
NetR403_2: R403.2 U402.2 U403.21 | length 10.5
  Top Layer w0.254: U403.21 11.9,15.25 12.196,14.954 ; 12.196,14.953 12.945,14.204 17.986,14.204 19.28,12.91 U402.2 19.265,12.435 19.265,10.89 R403.2
NetR404_2: R404.2 U402.3 U403.20 | length 11.1
  Top Layer w0.254: U403.20 12.7,15.25 12.996,14.954 ; 12.996,14.953 13.291,14.658 18.457,14.658 19.934,13.181 19.934,12.567 20.051,12.45 U402.3 20.562,12.438 20.562,10.887 R404.2
NetR501_1: R501.1 U501.4 | length 1.2
  Top Layer w0.254: R501.1 17.971,21.572 18.118,21.425 U501.4
NetR502_1: R502.1 U501.1 | length 0.9
  Top Layer w0.254: U501.1 R502.1
NetR502_2: pad.5 R502.2 U402.7 | length 5.8
  Top Layer w0.254: U402.7@19.28,17.49 U402.7 19.28,18.41 20.245,19.375 R502.2 23.375,19.375 pad.5
NetR504_1: R504.1 U501.5 | length 1.3
  Top Layer w0.254: R504.1 17.971,20.397 18.349,20.775 U501.5
NetR505_1: R505.1 U502.4 | length 1.1
  Top Layer w0.254: U502.4 83.482,20.55 R505.1
NetR506_1: pad.7 R506.1 U502.1 | length 2.3
  Top Layer w0.254: pad.7 79.125,21.8 R506.1 79.212,21.863 80.387,21.863 U502.1
NetR508_1: R508.1 U502.5 | length 1.4
  Top Layer w0.254: U502.5 83.026,21.2 83.529,21.703 R508.1
NetR601_2: R601.2 RV601.1 | length 1.2
  Top Layer w0.254: RV601.1 R601.2
NetR602_2: R602.2 RV602.1 | length 1.1
  Top Layer w0.254: R602.2 RV602.1
NetR603_1: R603.1 RV601.3 | length 1.2
  Top Layer w0.254: RV601.3 R603.1
NetR604_1: R604.1 RV602.3 | length 1.1
  Top Layer w0.254: R604.1 RV602.3@15.725,31.025
NetR605_2: R605.2 R607.2 U601.3 | length 2.3
  Top Layer w0.254: U601.3 17.721,41.425 17.8,41.346 R607.2
NetR606_1: R606.1 U601.6 | length 0.9
  Top Layer w0.254: R606.1 13.85,41.525 13.95,41.425 U601.6
NetR606_2: pad.6 R606.2 U602.1 | length 3.4
  Top Layer w0.254: pad.6 11.925,43.475 U602.1 R606.2
NetR607_1: R607.1 U601.1 | length 1.6
  Top Layer w0.254: U601.1 16.59,40.425 17.29,39.725 17.7,39.725 R607.1
NetR608_2: R608.2 R610.2 U603.3 | length 2.6
  Top Layer w0.254: R610.2 81.9,33.65 82,33.55 U603.3
NetR609_1: R609.1 U603.6 | length 0.8
  Top Layer w0.254: U603.6 R609.1
NetR609_2: pad.8 R609.2 U604.1 | length 2.7
  Top Layer w0.254: R609.2 U604.1 87.925,31.925 pad.8@87.9,31.9
NetR610_1: R610.1 U603.1 | length 0.9
  Top Layer w0.254: R610.1 82.65,34.65 82.75,34.55 U603.1
Vin: C201.2 C202.2 C209.2 C210.2 C217.2 C301.2 C302.2 C309.2 J103.1 J103.2 J103.3 J103.4 J103.5 J103.6 J107.1 J108.1 J111.1 J112.1 L201.1 R210.2 R701.2 R703.2 U201.1 U201.2 U201.3 U202.1 U202.2 U202.3 U203.1 U203.2 U203.3 U204.1 U204.2 U204.3 U205.2 U301.1 U301.2 U301.3 U302.1 U302.2 U302.3 U303.1 U303.2 U303.3 | length 112.6
  Top Layer w0.254: R210.2 42.9,12 43.2,11.7 C217.2 44.8,11.7 ; J103.6 J103.5 J103.4 J103.3 J103.2 ; U205.2 44.8,11.7 ; J103.1 J103.2 ; 44.8,11.7 44.8,9.2 45.8,8.2 L201.1 53.8,8.2 54.2,7.8 J103.2
  Bottom Layer w0.254: R701.2 9.477,17.75 9.6,17.627 9.6,11.599 13.453,7.746 15.046,7.746 ; J112.1 11.99,6.35 13.65,6.35 15.046,7.746 ; U202.1 U202.2 ; U202.3 U202.2 ; U201.1 U201.2 ; U201.3 U201.2 ; U302.3 U302.2 ; U302.1 U302.2 ; U303.3 U303.2 ; C309.2@23.95,8.575 23.95,8.45 23.246,7.746 23.246,7.321 21.271,5.346 19.153,5.346 16.299,8.2 15.8,8.2 C301.2@15.65,8.35 ; C309.2 U303.2 ; U303.1 U303.2 ; U301.3 U301.2 ; C302.2 U301.2 ; U203.1 U203.2 ; U204.3 U204.2 C210.2 90.425,37.9 91.237,38.712 91.237,40.778 J108.1 91.9,43.04 91.36,43.04 90.406,43.994 89.019,43.994 U203.2 ; U204.1 89.075,38.375 U204.2@89.075,37.875 ; 89.075,43.675 89.075,43.929 89.029,43.975 U203.2 ; R703.2 93,15.14 J107.1 89.195,14.84 87.805,13.45 85.1,13.45 85.05,13.4 U301.1 U301.2 ; U202.2 C201.2 10,33.825 8.935,32.76 J111.1 9.05,34.51 9.05,38.35 10.15,39.45 C202.2 U201.2 ; 15.046,7.746 C301.2@15.65,8.35 ; C301.2@15.65,8.35 C301.2 U302.2
Vvar: C601.2 C602.2 RV601.2 RV602.2 U602.3 U604.3 | length 69.8
  Top Layer w0.254: U602.3 10.025,41.685 9.91,41.8 8.801,41.8 8.101,42.5 6.3,42.5 5.8,42 5.8,31.417 5.917,31.3 11.6,31.3 12.8,30.1 16.45,30.1 17.7,31.35 21.35,31.35 21.75,31.75 RV602.2 ; RV602.2@22.125,31.875 C602.2 ; C601.2 RV601.2@79.275,43.225 ; v1(79.2,45.7) 79.675,45.225 RV601.2 ; U604.3 89.875,33.6 v1(90.4,33.6)
  Bottom Layer w0.254: v1(79.2,45.7) 79.579,46.079 87.479,46.079 87.7,46.3 92.2,46.3 94.4,44.1 94.4,33.399 93.747,32.746 90.556,32.746 90.402,32.9 90.402,33.598 v1(90.4,33.6)
pads on no net: U201.5 U202.5 U203.5 U204.5 U205.4 U205.6 U301.5 U302.5 U303.5 U401.1 U401.4 U401.6 U402.1 U402.4 U402.6 U403.3 U403.6 U403.7 U403.8 U403.10 U403.11 U403.12 U403.14 U403.15 U403.16 U403.17 U601.2 U603.2

## Polygon pours and split planes (outlines as drawn)
GND on Top Layer "GND_L01_P004" (solid, pour order 4): 1,24 31,24 31,1 1,1
GND on Top Layer "GND_L01_P003" (solid, pour order 3): 65,1 65,24 35,24 35,1
GND on Top Layer "GND_L01_P001" (solid, pour order 1): 69,28 69,47 99,47 99,28
GND on Top Layer "GND_L01_P002" (solid, pour order 2): 69,1 69,24 99,24 99,1
GND on Top Layer "GND_L01_P000" (solid, pour order 0): 1,47 1,28 31,28 31,47
GND on Bottom Layer "GND_L02_P009" (solid, pour order 9): 69,24 99,24 99,1 69,1
GND on Bottom Layer "GND_L02_P011" (solid, pour order 11): 1,24 31,24 31,1 1,1
GND on Bottom Layer "GND_L02_P008" (solid, pour order 8): 69,47 99,47 99,28 69,28
GND on Bottom Layer "GND_L02_P007" (solid, pour order 7): 1,47 31,47 31,28 1,28
GND on Bottom Layer "GND_L02_P010" (solid, pour order 10): 35,24 65,24 65,1 35,1

## Silkscreen, mask and mechanical layers (free items; w line width, h text height)
Top Overlay:
  drawing of 25 lines, arcs and shapes, not listed
  text "Rx TP" at 10.4,44.1 h1
  text "Rytis Lungys / FPGA_OPTI_DLL_SYNC / 2026/11/03 / APD Module" at 4.3,43.5 h1
  text "GND" at 71.9,42.811 h1
  text "VIN" at 94.4,41.9 h1
  text "FPGA Pmod" at 1,40.811 h1
  text "135V" at 71.8,40.112 h1
  text "GND" at 94.4,39.511 h1
  text "GND" at 3.9,38.111 h1
  text "GND" at 94.4,36.411 h1
  text "GND" at 3.8,34.911 h1
  text "135V" at 27.4,34.712 h1
  text "FPGA Pmod" at 94.2,33.611 h1
  text "VIN" at 4.2,32.2 h1
  text "GND" at 27.4,31.911 h1
  text "Rytis Lungys / FPGA_OPTI_DLL_SYNC / 2026/11/03 / APD Module" at 72.7,31.4 h1 r90
  text "Rx TP" at 91,31.4 h1 r180
  text "Tx TP" at 75.1,21.5 h1
  text "135V" at 38.5,21.012 h1
  text "135V" at 59.6,20.9 h1
  text "Tx TP" at 24.4,19.1 h1
  text "IO4" at 1.889,18.5 h1 r90
  text "GND" at 1.089,18.3 h1 r90
  text "FPGA Pmod" at 73.2,17.111 h1
  text "IO9" at 1.089,16 h1 r90
  text "IO3" at 1.888,16 h1 r90
  text "VIN" at 94.3,14.7 h1
  text "GND" at 38.6,14.611 h1
  text "GND" at 59.6,14.6 h1
  text "GND" at 75.8,14.311 h1
  text "IO8" at 1.089,13.5 h1 r90
  text "IO2" at 1.889,13.5 h1 r90
  text "GND" at 94.3,11.911 h1
  text "IO7" at 1.089,11 h1 r90
  text "IO1" at 1.889,11 h1 r90
  text "IO6" at 1.089,8.4 h1 r90
  text "IO0" at 1.889,8.4 h1 r90
  text "IO5" at 1.089,5.9 h1 r90
  text "GND" at 1.889,5.7 h1 r90
  text "VIN {" at 40.4,4.688 h1
  text "} VIN" at 58.5,4.688 h1
  text "Rytis Lungys / FPGA_OPTI_DLL_SYNC / 2026/11/03 / Normal Laser Module" at 98.8,4.4 h1 r90
  text "FPGA Pmod" at 17,4.311 h1
  text "Rytis Lungys / FPGA_OPTI_DLL_SYNC / 2026/11/03 / 135V Boost Module" at 64.8,4.2 h1 r90
  text "Rytis Lungys / FPGA_OPTI_DLL_SYNC / 2026/11/03 / Delayed Laser Module" at 30.7,4.1 h1 r90
  text "} GND" at 58.5,2.188 h1
  text "GND" at 12.2,1.811 h1
  text "GND {" at 39.9,1.788 h1
  text "GND" at 5.7,1.511 h1
  text "VIN" at 8.6,1.5 h1
Bottom Overlay:
  drawing of 88 lines, arcs and shapes, not listed